# Altium PCB PCB.PcbDoc
Units mm, origin at the board's own origin, x right, y up, seen from the top; angles counter-clockwise.
Board outline 80 x 65 mm, 2 copper layers (Top Layer, Bottom Layer), stack 1.536 mm thick; 54 components, 26 nets, 159 pads, 39 vias.
Unrouted connection lines stored in the file: 2.
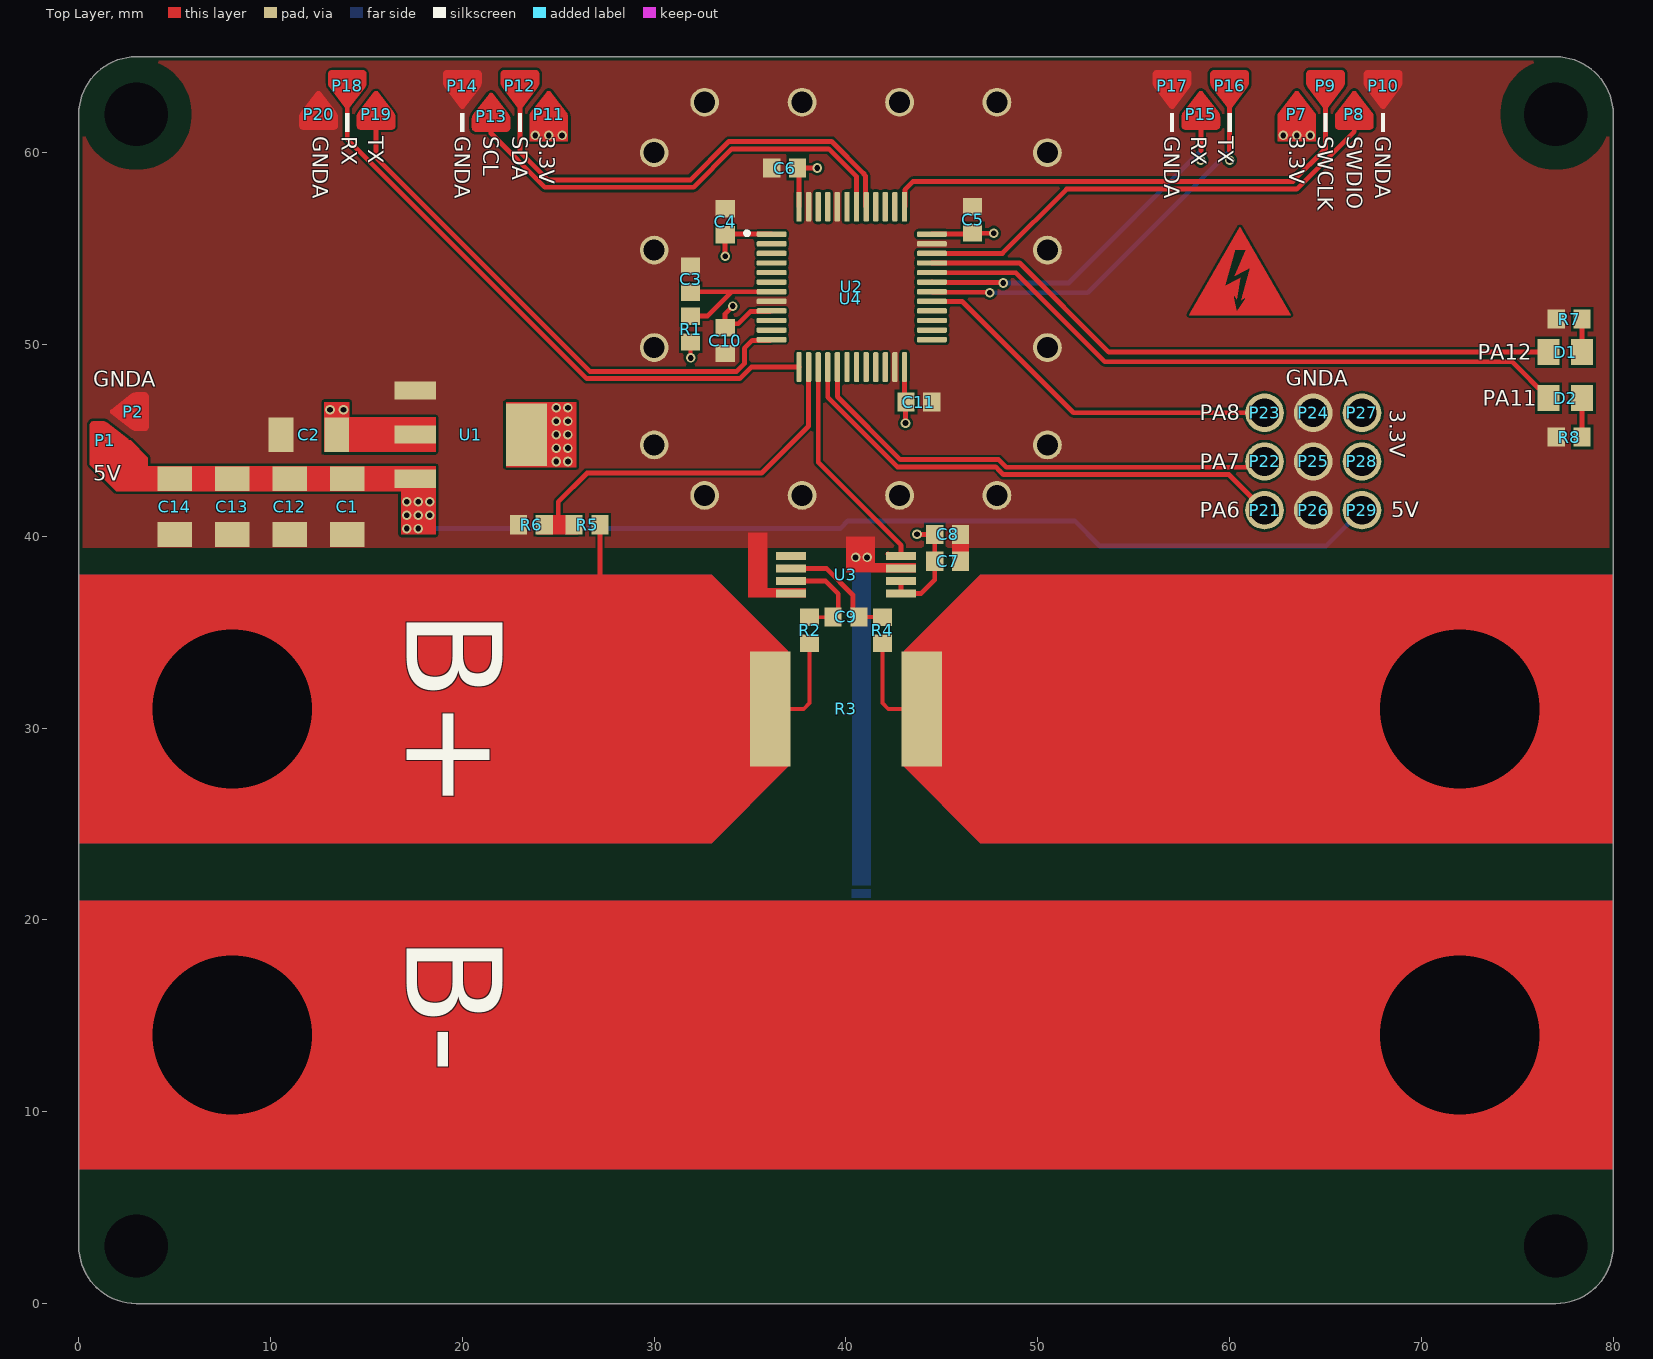
[diagram p0: Top Layer view]
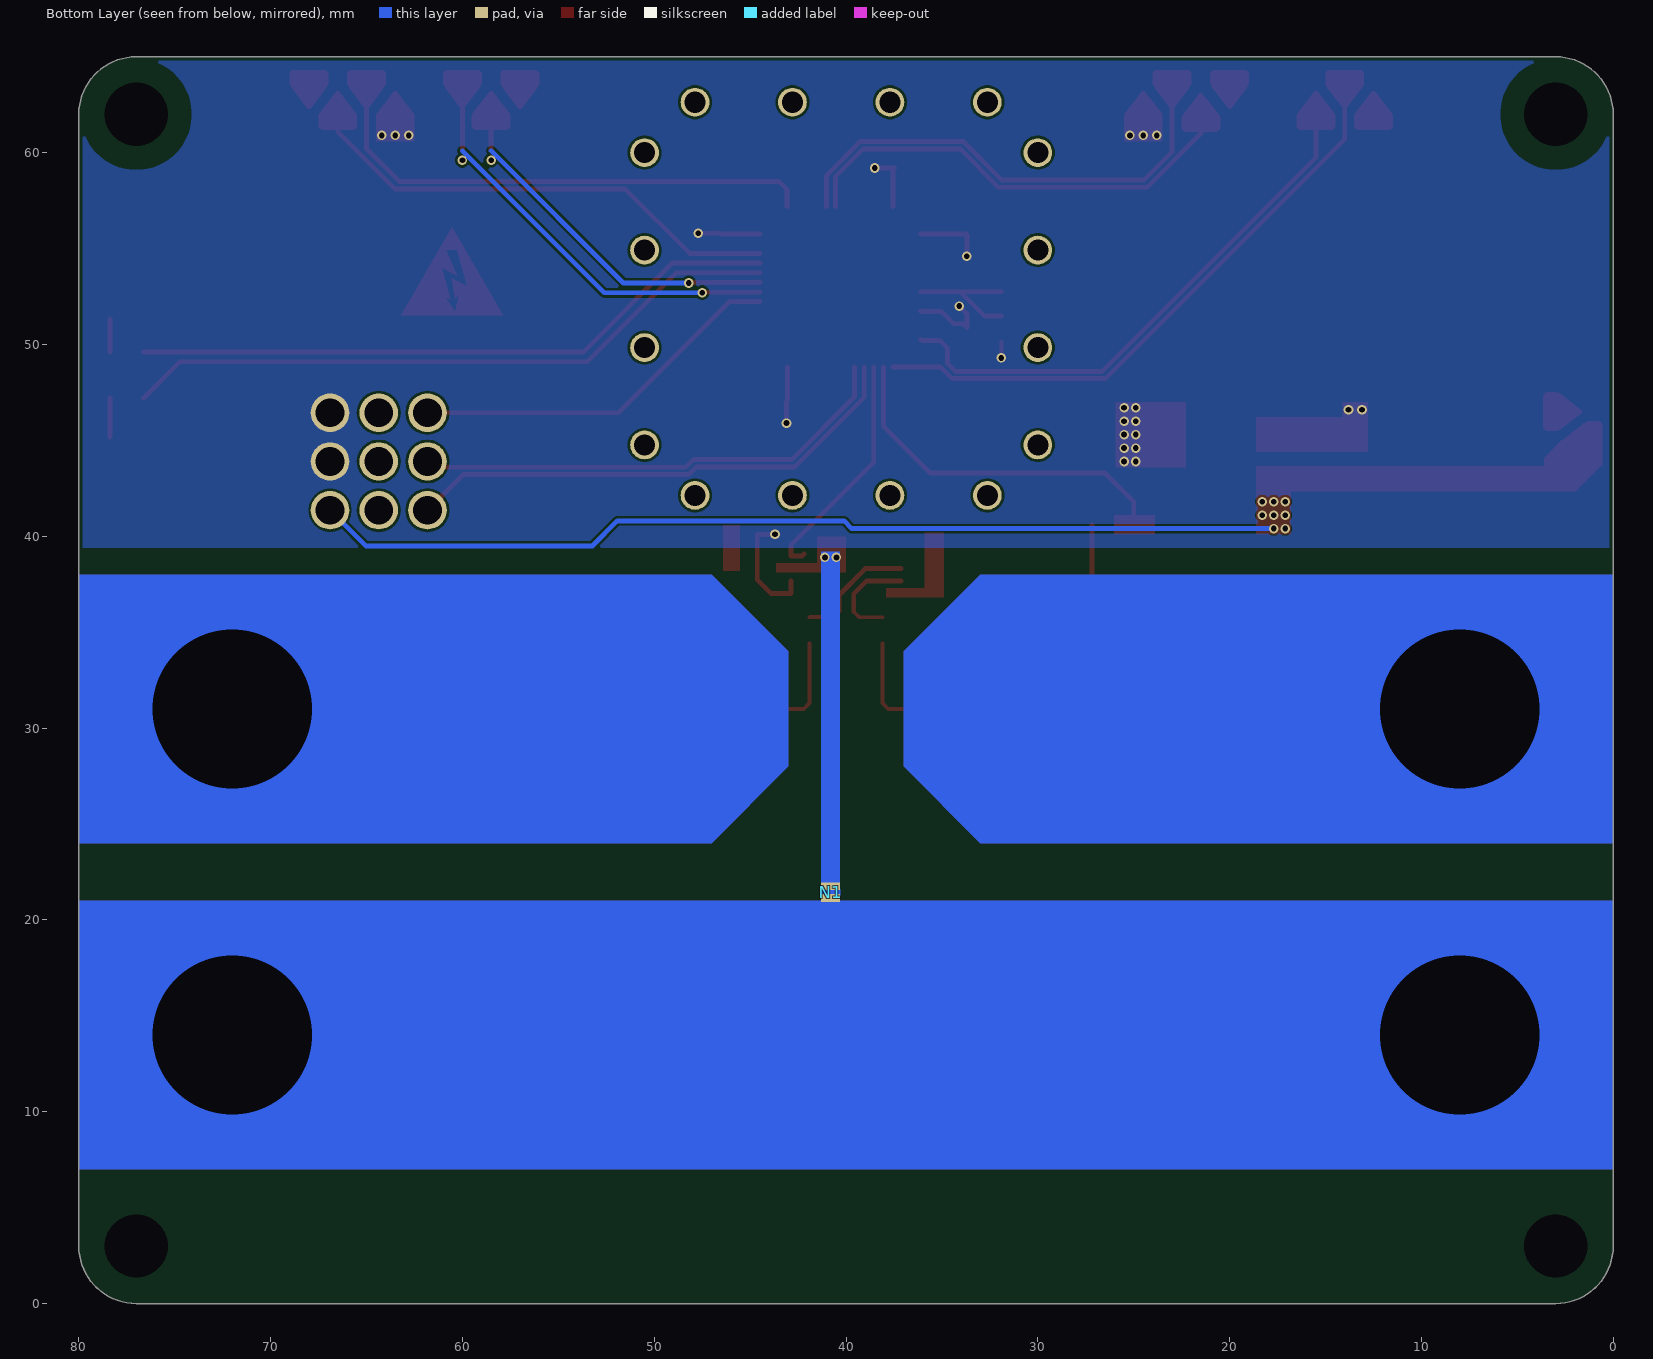
[diagram p1: Bottom Layer view, seen from below]
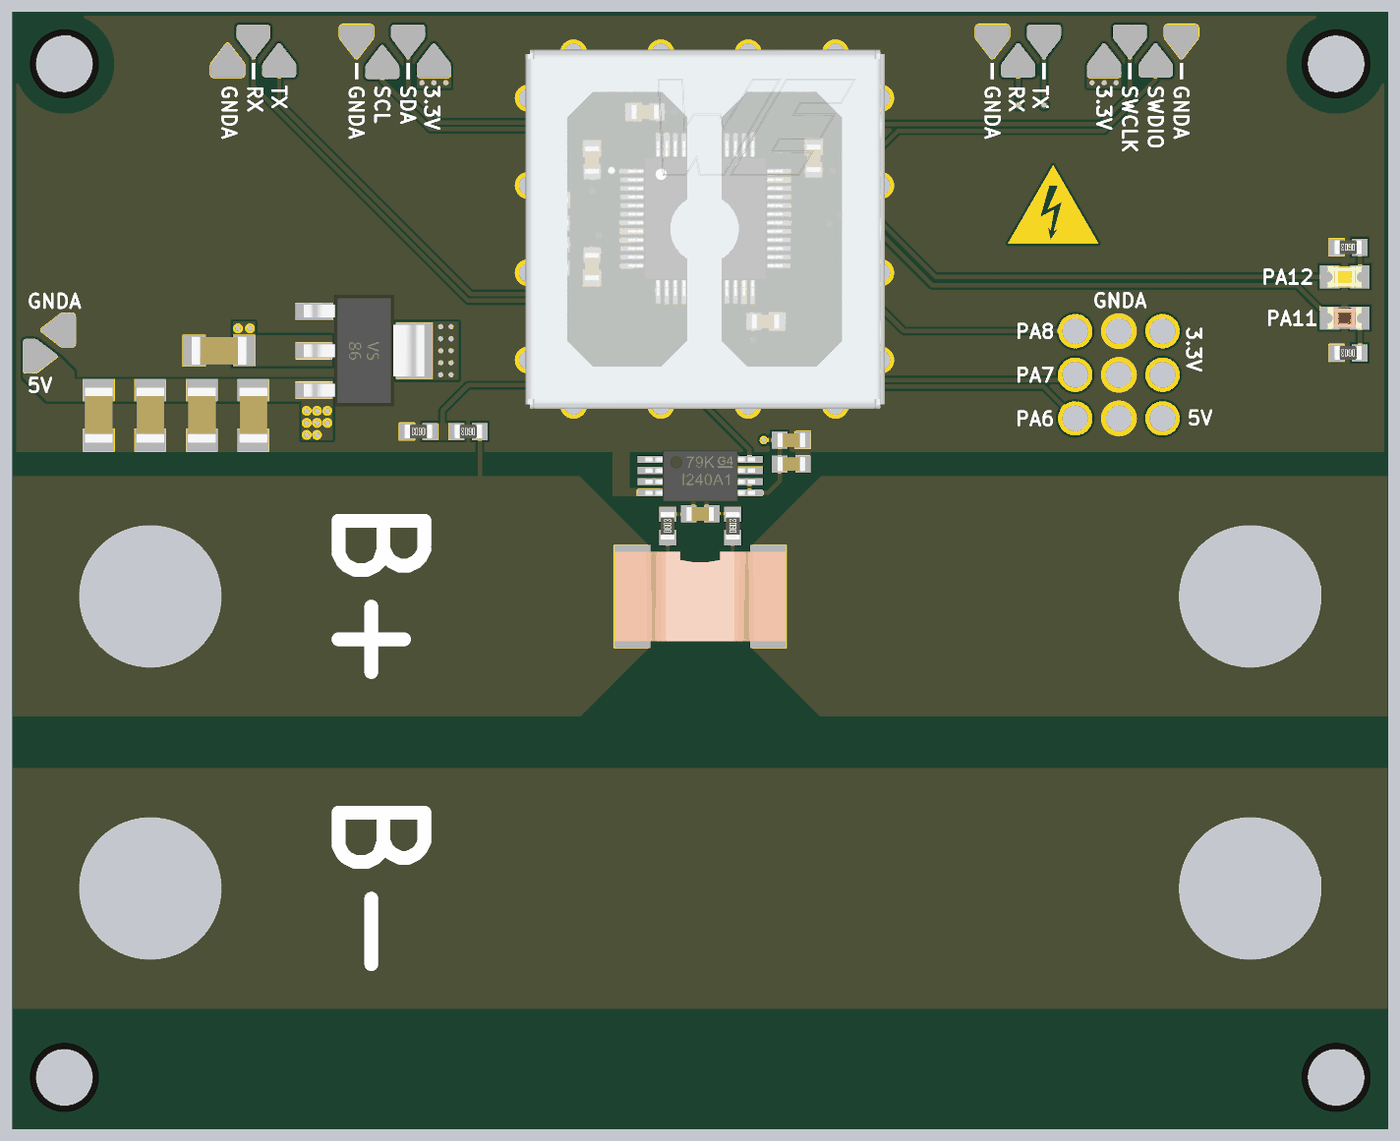
[diagram p2: 3D render of the assembled board from above, using the file's embedded part models]

## Layer stack, top to bottom
Top Solder: solder mask 0.0102, Solder Resist, Dk 3.5
Top Layer: signal copper 0.0356
Dielectric 1: dielectric 1.465, FR-4, Dk 4.8
Bottom Layer: signal copper 0.0356
Bottom Solder: solder mask 0.0102, Solder Resist, Dk 3.5

## Board outline
3,0 77,0 ccw(c77,3) 80,3 80,62 ccw(c77,62) 77,65 3,65 ccw(c3,62) 0,62 0,3 ccw(c3,3)

## Design rules (kind name [scope] priority, off if disabled: settings)
BoardOutlineClearance [All] p1: gap=0.2 ignorepadtopadclearanceinfootprint=FALSE
Clearance [All] p1: gap=0.127 ignorepadtopadclearanceinfootprint=FALSE
ComponentClearance [All] p1 off: gap=0.254 collisioncheckmode=3 verticalgap=0 showdistances=FALSE checkcomponentboundary=TRUE
DiffPairsRouting [All] p1: maxlimit=0.3 minlimit=0.3 mostfreqgap=0.3 toplayer_minwidth=0.2 toplayer_maxwidth=0.2 toplayer_prefwidth=0.2 bottomlayer_minwidth=0.2 bottomlayer_maxwidth=0.2 bottomlayer_prefwidth=0.2 maxuncoupledlength=12.7
PlaneConnect [All] p1: planeconnectstyle=Direct reliefexpansion=0.508 reliefentries=4 reliefconductorwidth=0.254 reliefairgap=0.254
PolygonConnect [All] p1: connectstyle=Direct reliefconductorwidth=0.254 reliefentries=4 polygonreliefangle="90 Angle" airgapwidth=0.254
RoutingVias [All] p1: holewidth=0.3 width=0.5 viastyle="Through Hole" minholewidth=0.3 minwidth=0.5 maxholewidth=0.711 maxwidth=1.27
ShortCircuit [InComponent('*1')or InComponent('*2') or InComponent('*3') vs InComponent('*1')or InComponent('*2') or InComponent('*3')] p1: allowed=TRUE
SilkToSilkClearance [All] p1 off: silktosilkclearance=0.254
SolderMaskExpansion [All] p1: expansion=0.035 istentingtop=FALSE
Width [All] p1: maxlimit=2 minlimit=0.127 preferedwidth=0.2
25 further rules are at their usual default settings.

## Components (designator, comment, footprint, x,y, rotation, side; value= is the part's Value field where it differs from the comment)
C1 "1206, 2.2uF" "CAP 1206_3216" 14,41.55 r90 top
C2 "1206, 2.2uF" "CAP 1206_3216" 12,45.3 r0 top
C3 "0603, 0.1uF" "CAP 0603_1608" 31.9,53.4 r90 top
C4 "0603, 0.1uF" "CAP 0603_1608" 33.7,56.4 r90 top
C5 "0603, 2.2uF" "CAP 0603_1608" 46.6,56.5 r90 top
C6 "0603, 1uF" "CAP 0603_1608" 36.8,59.2 r180 top
C7 "0603, 0.1uF" "CAP 0603_1608" 45.3,38.7 r0 top
C8 "0603, 2.22uF" "CAP 0603_1608" 45.3,40.1 r0 top
C9 "0603, 220pF" "CAP 0603_1608" 40,35.8 r0 top
C10 "0603, 1uF" "CAP 0603_1608" 33.7,50.2 r270 top
C11 "0603, 1uF" "CAP 0603_1608" 43.8,47 r0 top
C12 "1206, 2.2uF" "CAP 1206_3216" 11,41.55 r90 top
C13 "1206, 2.2uF" "CAP 1206_3216" 8,41.55 r90 top
C14 "1206, 2.2uF" "CAP 1206_3216" 5,41.55 r90 top
D1 "0805 LED" "LED 0805_2012 YELLOW" 77.5,49.6 r0 top
D2 "0805 LED" "LED 0805_2012 RED" 77.5,47.2 r0 top
N1 "NetTie" NETTİE 40.8,21.6 r90 bottom
P1 "Pad0" PAD#1 1.341,44.6 r270 top
P2 "Pad1" PAD#2 2.341,46.6 r90 top
P7 "Pad0" PAD#3 60.1,62.2 r0 top
P8 "Pad1" PAD#4 62.4,62.2 r180 top
P9 "Pad0" PAD#5 66.6,62.2 r0 top
P10 "Pad1" PAD#6 69.8,61.7 r180 top
P11 "Pad0" PAD#7 25.6,63.1 r0 top
P12 "Pad1" PAD#8 23.7,63.6 r180 top
P13 "Pad0" PAD#9 21.5,61.9 r0 top
P14 "Pad1" PAD#10 20.4,63.5 r180 top
P15 "Pad0" PAD#11 58.5,62.2 r0 top
P16 "Pad1" PAD#12 60,62.9 r180 top
P17 "Pad0" PAD#13 55.2,63.2 r180 top
P18 "Pad1" PAD#14 13.6,63.2 r180 top
P19 "Pad0" PAD#15 15.9,61.7 r0 top
P20 "Pad1" PAD#16 10.702,62.3 r0 top
P21 "Pad1" PAD#17 61.82,41.36 r90 top
P22 "Pad0" PAD#17 61.82,43.9 r90 top
P23 "Pad1" PAD#17 61.82,46.44 r90 top
P24 "Pad0" PAD#17 64.36,46.44 r90 top
P25 "Pad1" PAD#17 64.36,43.9 r90 top
P26 "Pad0" PAD#17 64.36,41.36 r90 top
P27 "Pad1" PAD#17 66.9,46.44 r90 top
P28 "Pad0" PAD#17 66.9,43.9 r90 top
P29 "Pad1" PAD#17 66.9,41.36 r90 top
R1 "0603, 10K" "RES 0603_1608" 31.9,50.8 r270 top
R2 "0603, 4.7R" "RES 0603_1608" 38.1,35.1 r90 top
R3 "WSLP3921L3000FEA" WSLP3921L3000FEA 40,31 r90 top
R4 "0603, 4.7R" "RES 0603_1608" 41.9,35.1 r90 top
R5 "0603, 100K" "RES 0603_1608" 26.5,40.6 r180 top
R6 "0603, 3.9K" "RES 0603_1608" 23.6,40.6 r180 top
R7 "0603, 2.2K" "RES 0603_1608" 77.7,51.325 r180 top
R8 "0603, 2.2K" "RES 0603_1608" 77.7,45.175 r180 top
U1 "TLV1117-33IDCYR" SOT230P700X180-4N 20.441,45.3 r0 top
U2 "STM32F103CBT6" QFP50P900X900X160-48N 40.3,53 r0 top
U3 "INA240A1PWR" INA240A1PWR 40,38 r0 top
U4 "36503205S" 36503205S 30,60 r0 top locked

## Footprints (in the part's own frame and the unit in brackets; to place one, negate y for a bottom-side part, rotate by r counter-clockwise, add the part's x,y. Pads: shape width x height; smd on the part's side, far side on the other; paste and mask are expansions set on the pad)
36503205S [mm]
  round 1.5 hole 1.1: 1(0,-15.24) 1(0,-10.16) 1(0,-5.08) 1(0,0) 1(2.63,-17.87) 1(2.63,2.63) 1(7.71,-17.87) 1(7.71,2.63) 1(12.79,-17.87) 1(12.79,2.63) 1(17.87,-17.87) 1(17.87,2.63) 1(20.5,-15.24) 1(20.5,-10.16) 1(20.5,-5.08) 1(20.5,0)
  body extent -0.16,-18.07 20.74,2.83, height 3.4
"CAP 0603_1608" [mm] "Chip Capacitor, 2-Leads, Body 1.60x0.80mm, IPC Medium Density"
  rect 0.9x1 smd: 1(-0.675,0) 2(0.675,0)
  body extent -0.8,-0.41 0.8,0.41, height 0.82
"CAP 1206_3216" [mm] "Chip Capacitor, 2-Leads, Body 3.25x1.60mm, IPC Medium Density"
  rect 1.3x1.8 smd: 1(-1.45,0) 2(1.45,0)
  body extent -1.6,-0.81 1.6,0.81, height 1.62
INA240A1PWR [mm]
  rect 1.57x0.41 smd: 1(-2.87,0.975) 2(-2.87,0.325) 3(-2.87,-0.325) 4(-2.87,-0.975) 5(2.87,-0.975) 6(2.87,-0.325) 7(2.87,0.325) 8(2.87,0.975)
  body extent -3.2,-1.5 3.2,1.5, height 1.21
"LED 0805_2012 RED" [mm] "Chip Diode, 2-Leads, Body 2.00x1.25mm, IPC Medium Density"
  rect 1.15x1.35 smd: 1(-0.875,0) 2(0.875,0)
  body extent -1,-0.63 1,0.63, height 0.91
"LED 0805_2012 YELLOW" [mm] "Chip Diode, 2-Leads, Body 2.00x1.25mm, IPC Medium Density"
  rect 1.15x1.35 smd: 1(-0.875,0) 2(0.875,0)
  body extent -1,-0.63 1,0.63, height 0.91
NETTİE [mm]
  rect 0.4x1 smd mask+0.102: 0(-0.454,0) 1(0.154,0)
  Top Layer region: 0.003,0.5 0.003,-0.5 -0.454,-0.5 -0.454,0.5
PAD#1 [mil]
  round 1 smd: 1(-15.75,1.61)
  Top Layer region: -55.12,-22.17 -55.12,-3.26 -54.36,1.35 -52.15,5.47 -52.15,5.47 -20.04,47.21 -18.14,48.77 -15.75,49.33 -13.36,48.77 -11.46,47.21 -11.45,47.21 20.57,5.58 22.84,1.35 23.62,-3.39 23.62,-3.39 23.62,-22.03 23.02,-25.04 21.32,-27.58 18.77,-29.29 15.77,-29.88 15.77,-29.88 -47.4,-29.88 -50.36,-29.3 -52.86,-27.62 -54.53,-25.12 -55.12,-22.17
PAD#2 [mil]
  round 1 smd: 1(-3.94,-19.68)
  Top Layer region: -43.31,-43.47 -43.31,-24.56 -42.54,-19.94 -40.34,-15.82 -40.34,-15.82 -8.23,25.92 -6.33,27.47 -3.94,28.03 -1.55,27.47 0.35,25.91 0.36,25.92 32.38,-15.72 34.65,-19.95 35.43,-24.69 35.43,-24.69 35.43,-43.33 34.84,-46.33 33.13,-48.88 30.59,-50.58 27.58,-51.18 27.58,-51.18 -35.59,-51.18 -38.54,-50.59 -41.05,-48.92 -42.72,-46.42 -43.31,-43.47
PAD#3 [mil]
  round 1 smd: 1(133.86,-7.87)
  Top Layer region: 94.49,-31.66 94.49,-12.75 95.25,-8.13 97.46,-4.01 97.46,-4.01 129.57,37.73 131.47,39.28 133.86,39.84 136.25,39.28 138.15,37.72 138.15,37.73 170.18,-3.91 172.44,-8.14 173.23,-12.88 173.23,-12.88 173.23,-31.52 172.63,-34.52 170.93,-37.07 168.38,-38.77 165.38,-39.37 165.38,-39.37 102.2,-39.37 99.25,-38.78 96.75,-37.11 95.08,-34.61 94.49,-31.66
PAD#4 [mil]
  round 1 smd: 1(-161.42,7.87)
  Top Layer region: -122.05,31.66 -122.05,12.75 -122.81,8.13 -125.02,4.01 -125.02,4.01 -157.13,-37.73 -159.03,-39.28 -161.42,-39.84 -163.81,-39.28 -165.71,-37.72 -165.71,-37.73 -197.74,3.91 -200.01,8.14 -200.79,12.88 -200.79,12.88 -200.79,31.52 -200.19,34.52 -198.49,37.07 -195.94,38.77 -192.94,39.37 -192.94,39.37 -129.76,39.37 -126.81,38.78 -124.31,37.11 -122.64,34.61 -122.05,31.66
PAD#5 [mil]
  round 1 smd: 1(-63,51.18)
  Top Layer region: -23.63,74.96 -23.63,56.05 -24.39,51.44 -26.6,47.32 -26.6,47.32 -58.7,5.58 -60.6,4.02 -62.99,3.47 -65.39,4.03 -67.29,5.58 -67.29,5.58 -99.31,47.21 -101.58,51.45 -102.36,56.19 -102.37,56.19 -102.37,74.83 -101.77,77.83 -100.07,80.38 -97.52,82.08 -94.51,82.68 -94.51,82.68 -31.34,82.68 -28.39,82.09 -25.88,80.42 -24.21,77.92 -23.63,74.96
PAD#6 [mil]
  round 1 smd: 1(70.87,-70.87)
  Top Layer region: 31.5,-94.65 31.5,-75.74 32.26,-71.13 34.47,-67.01 34.47,-67 66.57,-25.27 68.47,-23.71 70.87,-23.15 73.26,-23.71 75.16,-25.27 75.16,-25.27 107.18,-66.9 109.45,-71.13 110.24,-75.87 110.24,-75.87 110.24,-94.51 109.64,-97.52 107.94,-100.06 105.39,-101.76 102.38,-102.36 102.38,-102.36 39.21,-102.36 36.26,-101.78 33.76,-100.1 32.08,-97.6 31.5,-94.65
PAD#7 [mil]
  round 1 smd: 1(-43.31,-43.31)
  Top Layer region: -82.68,-67.09 -82.68,-48.18 -81.91,-43.57 -79.71,-39.45 -79.71,-39.45 -47.6,2.29 -45.7,3.85 -43.31,4.41 -40.92,3.85 -39.02,2.29 -39.01,2.29 -6.99,-39.34 -4.72,-43.57 -3.94,-48.31 -3.94,-48.31 -3.94,-66.95 -4.53,-69.96 -6.24,-72.5 -8.78,-74.21 -11.79,-74.8 -11.79,-74.8 -74.96,-74.8 -77.92,-74.22 -80.42,-72.54 -82.09,-70.04 -82.68,-67.09
PAD#8 [mil]
  round 1 smd: 1(27.56,3.94)
  Top Layer region: -11.81,-19.85 -11.81,-0.93 -11.05,3.68 -8.84,7.8 -8.84,7.8 23.27,49.54 25.17,51.09 27.56,51.65 29.95,51.09 31.85,49.54 31.85,49.54 63.88,7.91 66.15,3.67 66.93,-1.07 66.93,-1.07 66.93,-19.71 66.33,-22.71 64.63,-25.26 62.08,-26.96 59.08,-27.56 59.08,-27.56 -4.1,-27.56 -7.05,-26.97 -9.55,-25.3 -11.22,-22.8 -11.81,-19.85
PAD#9 [mil]
  round 1 smd: 1(0,0)
  Top Layer region: -39.37,-23.78 -39.37,-4.87 -38.61,-0.26 -36.4,3.86 -36.4,3.86 -4.29,45.6 -2.39,47.16 0,47.71 2.39,47.16 4.29,45.6 4.29,45.6 36.32,3.97 38.59,-0.27 39.37,-5.01 39.37,-5.01 39.37,-23.64 38.77,-26.65 37.07,-29.2 34.52,-30.9 31.52,-31.5 31.52,-31.5 -31.66,-31.5 -34.61,-30.91 -37.11,-29.24 -38.78,-26.73 -39.37,-23.78
PAD#10 [mil]
  round 1 smd: 1(15.75,0)
  Top Layer region: -23.62,-23.78 -23.62,-4.87 -22.86,-0.26 -20.65,3.86 -20.65,3.86 11.45,45.6 13.36,47.16 15.75,47.71 18.14,47.16 20.04,45.6 20.04,45.6 52.07,3.97 54.33,-0.27 55.12,-5.01 55.12,-5.01 55.12,-23.64 54.52,-26.65 52.82,-29.2 50.27,-30.9 47.27,-31.5 47.27,-31.5 -15.91,-31.5 -18.86,-30.91 -21.36,-29.24 -23.03,-26.73 -23.62,-23.78
PAD#11 [mil]
  round 1 smd: 1(0,-7.87)
  Top Layer region: -39.37,-31.66 -39.37,-12.75 -38.61,-8.13 -36.4,-4.01 -36.4,-4.01 -4.29,37.73 -2.39,39.28 0,39.84 2.39,39.28 4.29,37.72 4.29,37.73 36.32,-3.91 38.59,-8.14 39.37,-12.88 39.37,-12.88 39.37,-31.52 38.77,-34.52 37.07,-37.07 34.52,-38.77 31.52,-39.37 31.52,-39.37 -31.66,-39.37 -34.61,-38.78 -37.11,-37.11 -38.78,-34.61 -39.37,-31.66
PAD#12 [mil]
  round 1 smd: 1(0,-23.62)
  Top Layer region: -39.37,-47.4 -39.37,-28.49 -38.61,-23.88 -36.4,-19.76 -36.4,-19.76 -4.29,21.98 -2.39,23.53 0,24.09 2.39,23.53 4.29,21.98 4.29,21.98 36.32,-19.65 38.59,-23.89 39.37,-28.63 39.37,-28.63 39.37,-47.27 38.77,-50.27 37.07,-52.82 34.52,-54.52 31.52,-55.12 31.52,-55.12 -31.66,-55.12 -34.61,-54.53 -37.11,-52.86 -38.78,-50.36 -39.37,-47.4
PAD#13 [mil]
  round 1 smd: 1(-70.87,-11.81)
  Top Layer region: -110.24,-35.59 -110.24,-16.68 -109.47,-12.07 -107.27,-7.95 -107.27,-7.95 -75.16,33.79 -73.26,35.35 -70.87,35.9 -68.47,35.34 -66.57,33.79 -66.57,33.79 -34.55,-7.84 -32.28,-12.08 -31.5,-16.82 -31.5,-16.82 -31.5,-35.46 -32.09,-38.46 -33.8,-41.01 -36.34,-42.71 -39.35,-43.31 -39.35,-43.31 -102.52,-43.31 -105.47,-42.72 -107.98,-41.05 -109.65,-38.55 -110.24,-35.59
PAD#14 [mil]
  round 1 smd: 1(-15.75,-11.81)
  Top Layer region: -55.12,-35.59 -55.12,-16.68 -54.36,-12.07 -52.15,-7.95 -52.15,-7.95 -20.04,33.79 -18.14,35.35 -15.75,35.9 -13.36,35.34 -11.46,33.79 -11.45,33.79 20.57,-7.84 22.84,-12.08 23.62,-16.82 23.62,-16.82 23.62,-35.46 23.02,-38.46 21.32,-41.01 18.77,-42.71 15.77,-43.31 15.77,-43.31 -47.4,-43.31 -50.36,-42.72 -52.86,-41.05 -54.53,-38.55 -55.12,-35.59
PAD#15 [mil]
  round 1 smd: 1(-15.75,11.81)
  Top Layer region: -55.12,-11.97 -55.12,6.94 -54.36,11.55 -52.15,15.67 -52.15,15.67 -20.04,57.41 -18.14,58.97 -15.75,59.52 -13.36,58.97 -11.46,57.41 -11.45,57.41 20.57,15.78 22.84,11.54 23.62,6.8 23.62,6.8 23.62,-11.83 23.02,-14.84 21.32,-17.39 18.77,-19.09 15.77,-19.69 15.77,-19.69 -47.4,-19.69 -50.36,-19.1 -52.86,-17.43 -54.53,-14.92 -55.12,-11.97
PAD#16 [mil]
  round 1 smd: 1(70.8,-11.81)
  Top Layer region: 31.43,-35.59 31.43,-16.68 32.19,-12.07 34.4,-7.95 34.4,-7.95 66.5,33.79 68.4,35.35 70.8,35.9 73.19,35.34 75.09,33.79 75.09,33.79 107.11,-7.84 109.38,-12.08 110.17,-16.82 110.17,-16.82 110.17,-35.46 109.57,-38.46 107.87,-41.01 105.32,-42.71 102.31,-43.31 102.32,-43.31 39.14,-43.31 36.19,-42.72 33.69,-41.05 32.01,-38.55 31.43,-35.59
PAD#17 [mil]
  oval 78.74x79.21 hole 59.06: 1(0,0)
QFP50P900X900X160-48N [mm]
  rrect50% 1.56x0.28 smd: 1(-4.18,2.75) 2(-4.18,2.25) 3(-4.18,1.75) 4(-4.18,1.25) 5(-4.18,0.75) 6(-4.18,0.25) 7(-4.18,-0.25) 8(-4.18,-0.75) 9(-4.18,-1.25) 10(-4.18,-1.75) 11(-4.18,-2.25) 12(-4.18,-2.75) 25(4.18,-2.75) 26(4.18,-2.25) 27(4.18,-1.75) 28(4.18,-1.25) 29(4.18,-0.75) 30(4.18,-0.25) 31(4.18,0.25) 32(4.18,0.75) 33(4.18,1.25) 34(4.18,1.75) 35(4.18,2.25) 36(4.18,2.75)
  rrect50% 0.28x1.56 smd: 13(-2.75,-4.18) 14(-2.25,-4.18) 15(-1.75,-4.18) 16(-1.25,-4.18) 17(-0.75,-4.18) 18(-0.25,-4.18) 19(0.25,-4.18) 20(0.75,-4.18) 21(1.25,-4.18) 22(1.75,-4.18) 23(2.25,-4.18) 24(2.75,-4.18) 37(2.75,4.18) 38(2.25,4.18) 39(1.75,4.18) 40(1.25,4.18) 41(0.75,4.18) 42(0.25,4.18) 43(-0.25,4.18) 44(-0.75,4.18) 45(-1.25,4.18) 46(-1.75,4.18) 47(-2.25,4.18) 48(-2.75,4.18)
  silkscreen extent -5.56,2.69 -5.36,2.89, body extent -4.5,-4.5 4.5,4.5, height 1.6
"RES 0603_1608" [mm] "Chip Resistor, 2-Leads, Body 1.60x0.80mm, IPC Medium Density"
  rect 0.9x1 smd: 1(-0.675,0) 2(0.675,0)
  body extent -0.8,-0.4 0.8,0.4, height 0.45
SOT230P700X180-4N [mm]
  rect 2.15x0.95 smd: 1(-2.9,2.3) 2(-2.9,0) 3(-2.9,-2.3)
  rect 2.15x3.25 smd: 2(2.9,0)
  body extent -3.5,-3.25 3.5,3.25, height 1.81
WSLP3921L3000FEA [mm]
  rect 6x2.1 smd: 1(0,-3.95) 2(0,3.95)
  body extent -2.6,-5 2.6,5, height 1.19

## Part data
C1 C2 C12 C13 C14: library part "1206 Kapasitör", Voltage Rating=100V
C3: library part "0603 Kapasitör", Voltage Rating=100V
C4 C5 C6 C7 C8 C9 C10 C11: library part "0603 Kapasitör"
D1: library part "0805 LED Yellow"
D2: library part "0805 LED Red"
R1 R2 R4 R5 R6 R7 R8: library part "0603 Direnç"
U2: "ARMÂ® CortexÂ®-M3 STM32F1 Microcontroller IC 32-Bit Single-Core 72MHz 128KB (128K x 8) FLASH", Package="LQFP-48 STMicroelectronics", Check_prices=https://www.snapeda.com/parts/STM32F103CBT6/STMicroelectronics/view-part/?ref=eda, MF=STMicroelectronics, MP=STM32F103CBT6, SnapEDA_Link=https://www.snapeda.com/parts/STM32F103CBT6/STMicroelectronics/view-part/?ref=snap
U4: Manufacturer_Name="Wurth Elektronik", Mouser Part Number=710-36503205S, Datasheet Link=https://www.we-online.com/catalog/datasheet/36503205S.pdf, Geometry.Height=3mm, Manufacturer_Part_Number=36503205S, Mouser Price/Stock=https://www.mouser.co.uk/ProductDetail/Wurth-Elektronik/36503205S?qs=f9yNj16SXrI2DSLNsc02Mg%3D%3D

## Free pads (board coordinates)
  round 1.524 hole 3.3 unplated mask+1.25: ""(3,3) ""(3,62) ""(77,3) ""(77,62)
  round 0 hole 8.3 unplated mask+3: ""(8,14) ""(8,31) ""(72,14) ""(72,31)

## Via types
v1: diameter 0.5, hole 0.3, Top Layer to Bottom Layer, tented both sides, 25 vias
v2: diameter 0.5, hole 0.3, Top Layer to Bottom Layer, 14 vias

## Nets (pads, with @x,y where several pads share a name; then routed paths per layer and width w, separated by ;. In a path a pad name is that pad's centre, name@x,y a point inside that pad or via, vN(x,y) a via of type N, cw(c..) or ccw(c..) an arc to the next point about the centre after c; other vN are vias at no path point)
3.3V: C2.2 C4.1 C5.1 C6.1 C7.1 C8.1 C10.1 C11.1 P7.1 P11.1 P27.1 P28.1 R1.2 U1.2 U2.1 U2.9 U2.24 U2.36 U2.48 U3.5 U3.6 | length 24.5
  Top Layer w0.2: v2(31.9,49.3) R1.2
  Top Layer w0.254: C2.2@13.45,45.4 C2.2@13.95,45.9 ; v1(33.7,54.6) C4.1 33.725,55.75 U2.1 ; v1(34.1,52) 33.7,51.6 C10.1 33.908,51.083 34.383,51.083 35.01,51.71 36.08,51.71 U2.9 ; U2.48 37.55,59.125 C6.1 v1(38.5,59.2) ; U3.6 U3.5 43.925,37.025 44.625,37.725 C7.1 C8.1 v2(43.7,40.1) ; U2.24 43.05,47.075 C11.1 43.1,46.975 v1(43.1,45.9) ; U2.36 46.525,55.75 C5.1 46.625,55.8 v1(47.7,55.8)
  other v1: 24.9,43.9 25.5,43.9 24.9,44.6 25.5,44.6 24.9,45.3 25.5,45.3 24.9,46 25.5,46 24.9,46.7 25.5,46.7 23.8,60.9 24.5,60.9 25.2,60.9 62.8,60.9 63.5,60.9 64.2,60.9
  other v2: 13.1,46.6 13.8,46.6
5V: C1.2 C12.2 C13.2 C14.2 P1.1 P29.1 U1.3 | length 50.7
  Top Layer w0.254: 1.341,45 P1.1
  Bottom Layer w0.254: v2(17.7,40.4) 39.7,40.4 40.1,40.8 51.917,40.8 53.217,39.5 65.034,39.5 66.894,41.36 P29.1
  other v2: 17.1,40.4 17.1,41.1 17.7,41.1 18.3,41.1 17.1,41.8 17.7,41.8 18.3,41.8
Current: U2.15 U3.8 | length 12.4
  Top Layer w0.254: U2.15 38.55,43.85 42.87,39.53 U3.8 42.29,38.975 U3.8@42.185,39.08
GND: N1.0 pad.@8,14 pad.@72,14
GNDA: C1.1 C2.1 C3.2 C4.2 C5.2 C6.2 C7.2 C8.2 C10.2 C11.2 C12.1 C13.1 C14.1 N1.1 P2.1 P10.1 P14.1 P17.1 P20.1 P24.1 P25.1 P26.1 R6.2 R7.2 R8.2 U1.1 U2.8 U2.23 U2.35 U2.44 U2.47 U3.4 U3.7 U4.1
  other v2: 40.5,38.9 41.1,38.9
LED_R: D2.1 U2.32 | length 34.9
  Top Layer w0.254: U2.32 44.49,53.74 48.86,53.74 53.5,49.1 74.725,49.1 D2.1
LED_Y: D1.1 U2.33 | length 34.1
  Top Layer w0.254: U2.33 49.05,54.25 53.7,49.6 D1.1
NetC3_1: C3.1 R1.1 U2.7 | length 6.9
  Top Layer w0.254: R1.1 32.775,51.475 34.05,52.75 ; C3.1@31.9,52.75 34.05,52.75 ; U2.7 34.05,52.75
NetC9_1: C9.1 R2.2 U3.3 | length 5.3
  Top Layer w0.2: R2.2 39.3,35.775 C9.1@39.593,36.068
  Top Layer w0.254: U3.3 38.925,37.675 39.593,37.007 C9.1@39.593,36.068
NetC9_2: C9.2 R4.2 U3.2 | length 6.3
  Top Layer w0.2: C9.2@40.361,36.114 C9.2 41.875,35.8 R4.2
  Top Layer w0.254: U3.2 38.975,38.325 40.361,36.939 C9.2@40.361,36.114
NetD1_2: D1.2 R7.1 | length 1.7
  Top Layer w0.254: D1.2 R7.1
NetD2_2: D2.2 R8.1 | length 2
  Top Layer w0.254: R8.1 D2.2
PA6: P21.1 U2.16 | length 26.8
  Top Layer w0.254: U2.16 39.05,47.25 42.6,43.7 42.681,43.619 47.801,43.619 48.02,43.4 48.201,43.219 59.961,43.219 P21.1
PA7: P22.1 U2.17 | length 25.5
  Top Layer w0.254: U2.17 39.55,47.289 42.839,44 47.959,44 48.359,43.6 61.52,43.6 P22.1
PA8: P23.1 U2.29 | length 19.7
  Top Layer w0.254: U2.29 46.05,52.25 51.86,46.44 P23.1
RX1: P15.1 U2.31 | length 19.3
  Top Layer w0.254: U2.31 44.493,53.237 48.167,53.237 v1(48.2,53.204) ; 58.5,60.1 58.5,62.5
  Bottom Layer w0.254: v1(48.2,53.204) 48.204,53.2 51.6,53.2 58.5,60.1
  other v1: 58.5,59.6
RX2: P18.1 U2.13 | length 32.3
  Top Layer w0.254: 14,64 14,60.7 26.481,48.219 26.742,48.219 30.338,48.219 34.204,48.219 34.458,48.219 35.059,48.82 U2.13
SCL: P13.1 U2.42 | length 24.6
  Top Layer w0.254: 21.5,62.4 21.5,61 24.3,58.2 32.054,58.2 34.054,60.2 39.1,60.2 40.55,58.75 U2.42
SDA: P12.1 U2.41 | length 25.8
  Top Layer w0.254: 23,64 23,60.039 24.458,58.581 31.896,58.581 33.896,60.581 39.258,60.581 40.931,58.908 40.931,58.869 41.01,58.79 41.01,57.22 U2.41
SWCLK: P9.1 U2.37 | length 26.9
  Top Layer w0.254: U2.37 43.067,57.197 43.067,58.067 43.5,58.5 63.3,58.5 65,60.2 65,63.4
SWDIO: P8.1 U2.34 | length 26.1
  Top Layer w0.254: U2.34 48.15,54.75 51.5,58.1 63.5,58.1 66.5,61.1 66.5,62.5
TX1: P16.1 U2.30 | length 22.5
  Top Layer w0.254: U2.30 44.505,52.725 47.475,52.725 v1(47.5,52.7) ; 60,60.1 60,64
  Bottom Layer w0.254: v1(47.5,52.7) 52.6,52.7 60,60.1
  other v1: 60,59.6
TX2: P19.1 U2.12 | length 29.1
  Top Layer w0.254: 15.5,62.5 15.5,59.739 26.639,48.6 34.3,48.6 34.7,49 34.7,49.8 35.11,50.21 36.08,50.21 U2.12
VCC: pad.@8,31 R2.1 R3.2 R5.1 | length 8.3
  Top Layer w0.2: R3.2 37.8,31 38.1,31.3 R2.1
  Top Layer w0.254: R5.1 27.175,37.625 27.2,37.6
VCC2: pad.@72,31 R3.1 R4.1 | length 5.3
  Top Layer w0.2: R4.1 41.9,31.3 42.2,31 R3.1
Voltage: R5.2 R6.1 U2.14 | length 19.1
  Top Layer w0.254: 25,40.5 25,41.8 26.5,43.3 35.6,43.3 38.05,45.75 38.05,48.8 38.04,48.81 U2.14
pads on no net: U2.2 U2.3 U2.4 U2.5 U2.6 U2.10 U2.11 U2.18 U2.19 U2.20 U2.21 U2.22 U2.25 U2.26 U2.27 U2.28 U2.38 U2.39 U2.40 U2.43 U2.45 U2.46 U3.1

## Polygon pours and split planes (outlines as drawn)
3.3V on Bottom Layer "3.3V_L02_P001" (solid, pour order 1): 0,39.4 0,65 80,65 80,39.4
GNDA on Top Layer "GNDA_L01_P000" (solid, pour order 0): 0,39.4 0,65 80,65 80,39.4

## Other copper
Top Layer:
  rectangle net GNDA: 34.9,37.2 35.9,40.2
  rectangle net GNDA: 34.9,36.82 37.915,37.3
  rectangle net GNDA: 40,38.12 43.655,38.6
  rectangle net GNDA: 40,38.1 41.5,40
  rectangle net GNDA: 45.525,38.2 46.425,40.6
  region net Voltage: 26.039,40.1 26.039,41.1 23.889,41.1 23.889,40.1
  region net 3.3V: 12.8,44.4 12.8,47 14.1,47 14.1,46.2 18.6,46.2 18.6,44.4
  region net 5V: 0.582,45.002 0.582,43.718 1.95,42.35 16.8,42.35 16.8,40.1 18.616,40.1 18.616,43.65 3.6,43.65 3.6,44.1 2.698,45.002
  region net 3.3V: 22.3,43.6 22.3,47 25.934,47 25.934,43.6
  region net 3.3V: 23.5,61.876 23.5,60.6 25.5,60.6 25.5,61.873
  region: 2462 vertices and 2 holes, not listed, extent 57.896,51.537 63.176,56.116
  region net GND: 0,7 0,21 80,21 80,7
  region net 3.3V: 62.5,61.876 62.5,60.6 64.5,60.6 64.5,61.873
  region net VCC: 0,38 0,24 33,24 37,28 37,34 33,38
  region net VCC2: 43,34 43,28 47,24 80,24 80,38 47,38
Bottom Layer:
  rectangle net GNDA: 40.3,21.8 41.3,39.2
  region net VCC: 0,38 0,24 33,24 37,28 37,34 33,38
  region net VCC2: 43,34 43,28 47,24 80,24 80,38 47,38
  region net GND: 0,7 0,21 80,21 80,7
Multi-Layer:
  pour cut-out: 3,0.1 cw(c3,3) 0.1,3 cw(c3,3) 3,5.9 cw(c3,3) 5.9,3 cw(c3,3)
  pour cut-out: 77,0.1 cw(c77,3) 74.1,3 cw(c77,3) 77,5.9 cw(c77,3) 79.9,3 cw(c77,3)
  pour cut-out: 77,59.1 cw(c77,62) 74.1,62 cw(c77,62) 77,64.9 cw(c77,62) 79.9,62 cw(c77,62)
  pour cut-out: 3,59.1 cw(c3,62) 0.1,62 cw(c3,62) 3,64.9 cw(c3,62) 5.9,62 cw(c3,62)
  pour cut-out: 79.221,30.844 cw(c71.895,31.112) 72.507,23.807 cw(c72.219,31.301) 64.751,30.611 cw(c71.874,30.998) 71.619,38.127 cw(c72.052,30.971)
  pour cut-out: 79.221,13.844 cw(c71.895,14.112) 72.507,6.807 cw(c72.219,14.301) 64.751,13.611 cw(c71.874,13.998) 71.619,21.127 cw(c72.052,13.971)
  pour cut-out: 15.221,13.844 cw(c7.895,14.112) 8.507,6.807 cw(c8.219,14.301) 0.751,13.611 cw(c7.874,13.998) 7.619,21.127 cw(c8.052,13.971)
  pour cut-out: 15.221,30.844 cw(c7.895,31.112) 8.507,23.807 cw(c8.219,31.301) 0.751,30.611 cw(c7.874,30.998) 7.619,38.127 cw(c8.052,30.971)

## Silkscreen, mask and mechanical layers (free items; w line width, h text height)
Top Overlay:
  region: 56.9,62.05 56.9,61.1 57.1,61.1 57.1,62.05
  region: 59.9,62.05 59.9,61.1 60.1,61.1 60.1,62.05
  region: 64.9,62.05 64.9,61.1 65.1,61.1 65.1,62.05
  region: 67.9,62.05 67.9,61.1 68.1,61.1 68.1,62.05
  region: 13.9,62.05 13.9,61.1 14.1,61.1 14.1,62.05
  region: 19.9,62.05 19.9,61.1 20.1,61.1 20.1,62.05
  region: 22.9,62.05 22.9,61.1 23.1,61.1 23.1,62.05
  text "GNDA" at 12.2,60.85 h0.8 r270
  text "RX" at 13.7,60.85 h0.8 r270
  text "TX" at 15.1,60.85 h0.8 r270
  text "GNDA" at 19.6,60.85 h0.8 r270
  text "SCL" at 21.1,60.85 h0.8 r270
  text "SDA" at 22.6,60.85 h0.8 r270
  text "3.3V" at 24,60.85 h0.8 r270
  text "GNDA" at 56.6,60.85 h0.8 r270
  text "RX" at 58,60.85 h0.8 r270
  text "TX" at 59.4,60.85 h0.8 r270
  text "3.3V" at 63.1,60.85 h0.8 r270
  text "SWCLK" at 64.6,60.85 h0.8 r270
  text "SWDIO" at 66.1,60.85 h0.8 r270
  text "GNDA" at 67.6,60.85 h0.8 r270
  text "PA12" at 72.927,49.2 h0.8
  text "GNDA" at 62.934,47.84 h0.8
  text "GNDA" at 0.75,47.8 h0.8
  text "PA11" at 73.194,46.8 h0.8
  text "3.3V" at 68.34,46.6 h0.8 r270
  text "PA8" at 58.434,46.04 h0.8
  text "PA7" at 58.434,43.5 h0.8
  text "5V" at 0.75,42.9 h0.8
  text "5V" at 68.434,41 h0.8
  text "PA6" at 58.434,40.96 h0.8
  text "B+" at 17.101,36.165 h5 r270
  text "B-" at 17.101,19.165 h5 r270
Top Solder:
  region: 2462 vertices and 2 holes, not listed, extent 57.896,51.537 63.176,56.116